# Allegro board TMC2160A_V10_220915.brd
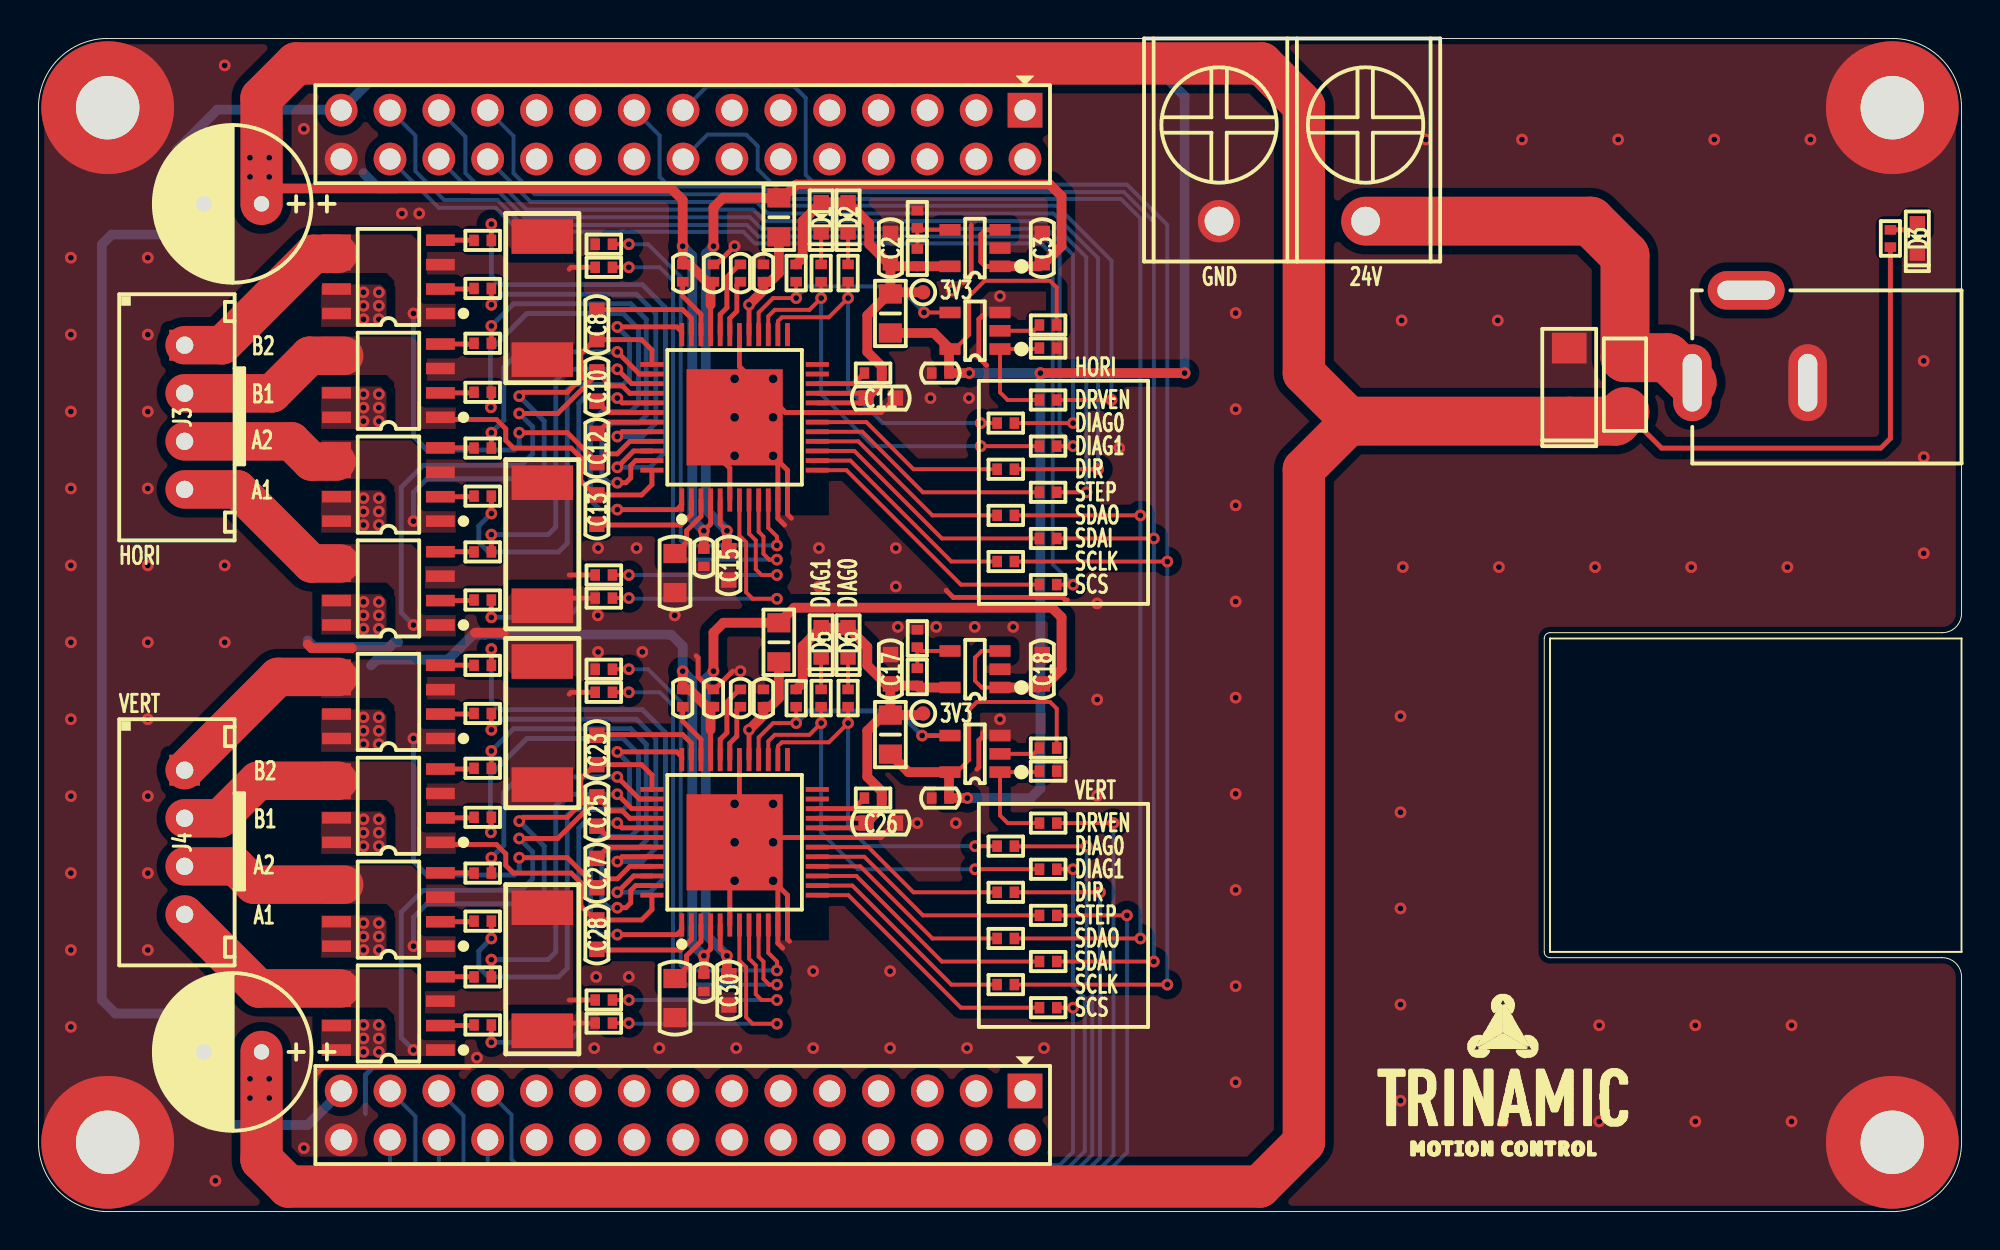
[diagram p0: board, top side]
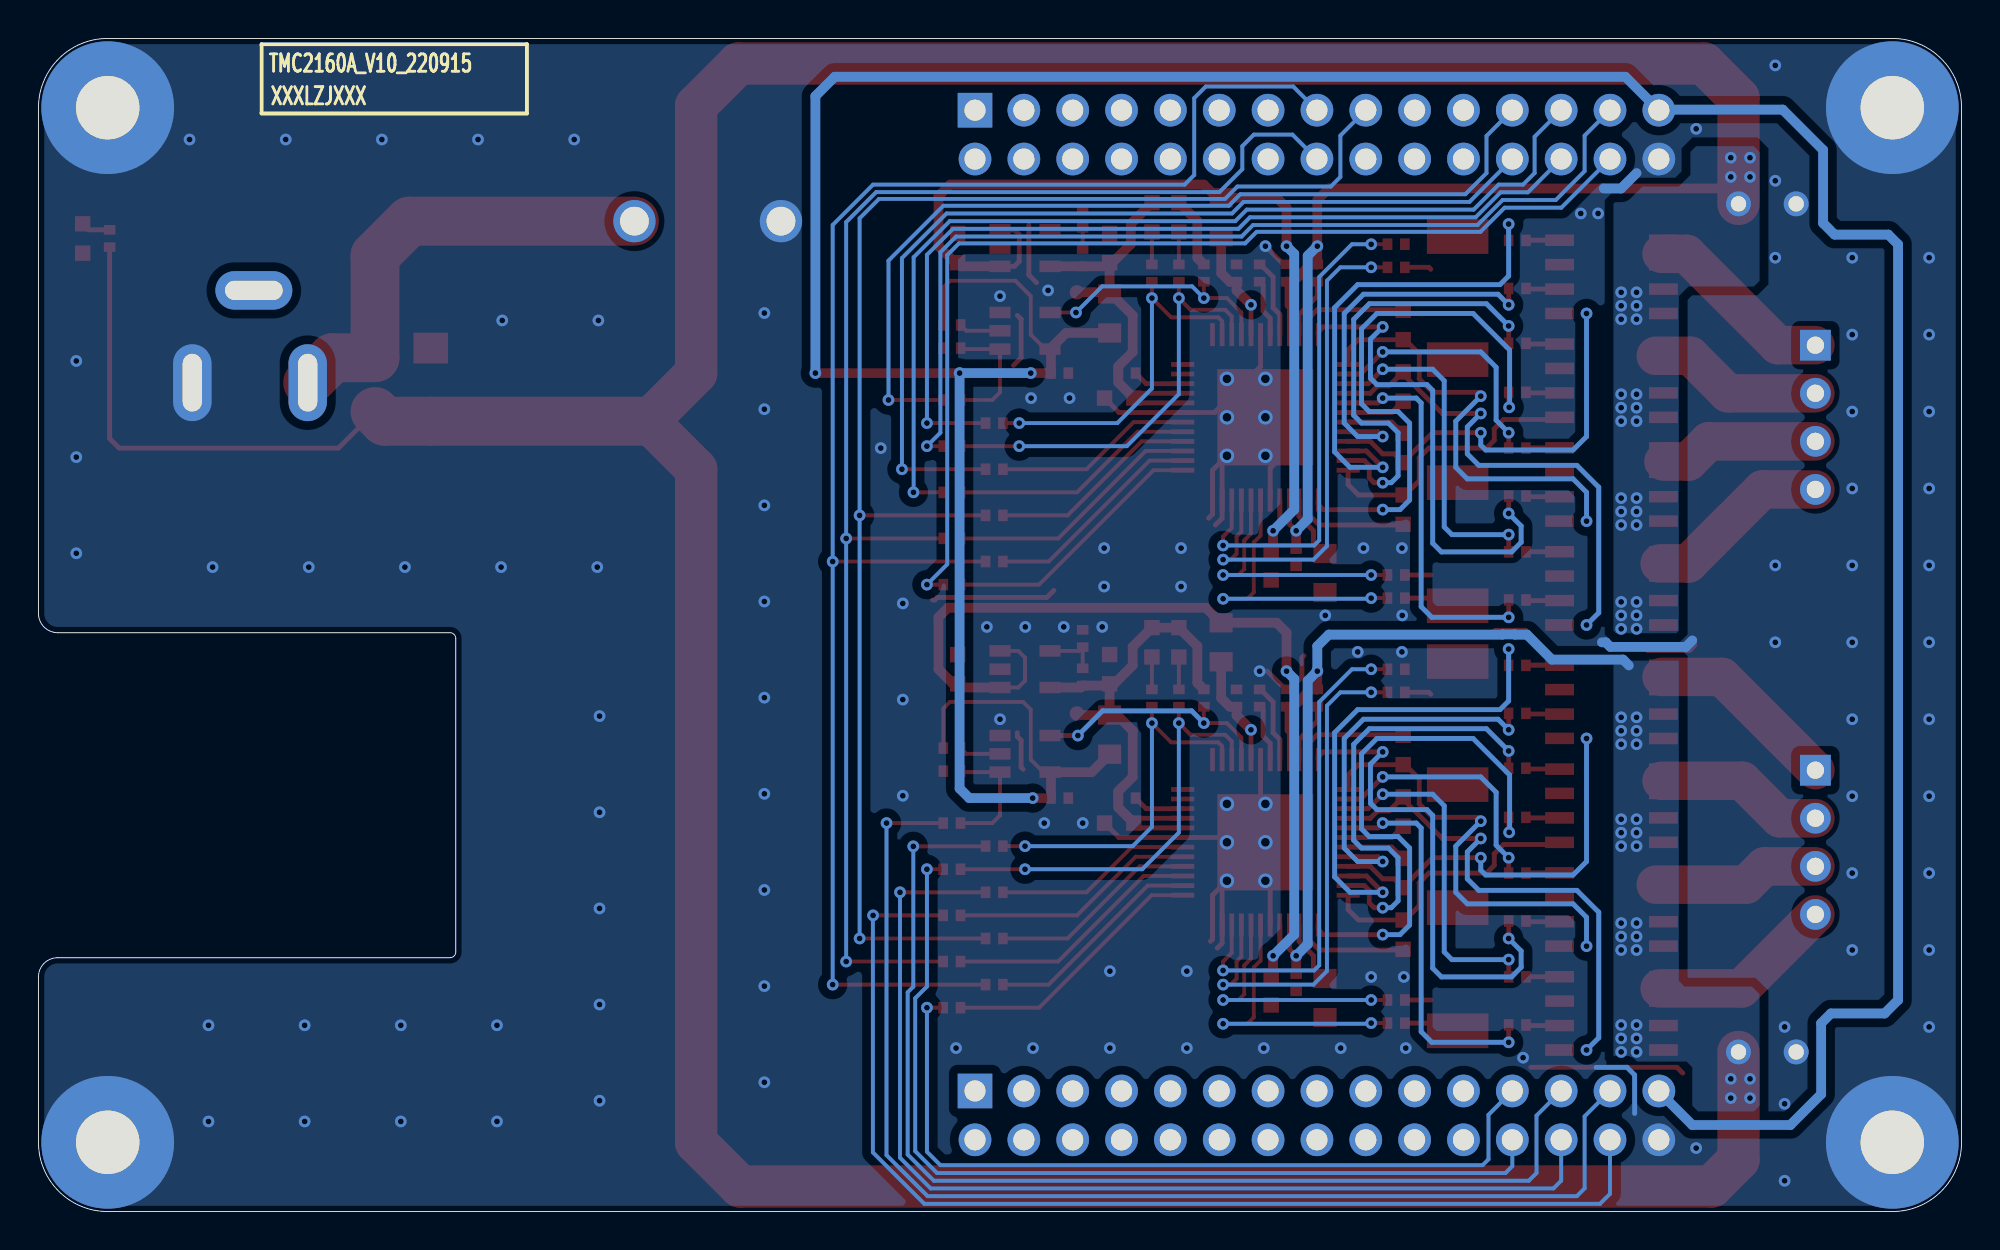
[diagram p1: board, bottom side, seen from below]

Outline 100 x 61 mm; copper layers: TOP, BOTTOM. Coordinates in mm from the lower left corner of the outline.
Outline path: 0,57.4 arc(1.05,59.95) 3.6,61 96.4,61 arc(98.95,59.95) 100,57.4 100,31.1 arc(99.71,30.39) 99,30.1 78.6,30.1 arc(78.39,30.01) 78.3,29.8 78.3,13.5 arc(78.39,13.29) 78.6,13.2 99,13.2 arc(99.71,12.91) 100,12.2 100,3.6 arc(98.95,1.05) 96.4,0 3.6,0 arc(1.05,1.05) 0,3.6 0,57.4

## Design rules (mm)
constraint set DEFAULT: min track width 0.203, pair gap 0.203

## Placement (name value [footprint] x y rotation side)
C1  100uF_50V  [CAP-3R0-8X12]  10.1 52.4 180 top
C2  10uF_10V  [C0603]  44.3 50.1 90 top
C3  10uF_10V  [C0603]  52.2 50.1 90 top
C4  100nF_50V  [C0402]  33.5 48.8 90 top
C5  100nF_50V  [C0402]  35.1 48.8 90 top
C6  22nF_50V  [C0402]  36.5 48.8 90 top
C7  100nF_50V  [C0402]  37.7 48.8 90 top
C8  470nF_50V  [C0603]  29.04 46.1 270 top
C9  100nF_50V  [C0402]  46.9 43.6 180 top
C10  470nF_50V  [C0603]  29.04 42.9 90 top
C11  10uF_10V  [C0603]  43.8 42.3 0 top
C12  470nF_50V  [C0603]  29.04 39.7 270 top
C13  470nF_50V  [C0603]  29.04 36.5 90 top
C14  100nF_50V  [C0402]  34.6 34 270 top
C15  10uF_10V  [C0603]  35.9 33.6 90 top
C16  10uF_25V  [C0805]  33.1 33.2 90 top
C17  10uF_10V  [C0603]  44.3 28.2 90 top
C18  10uF_10V  [C0603]  52.2 28.2 90 top
C19  100nF_50V  [C0402]  33.5 26.7 90 top
C20  100nF_50V  [C0402]  35.1 26.7 90 top
C21  22nF_50V  [C0402]  36.5 26.7 90 top
C22  100nF_50V  [C0402]  37.7 26.7 90 top
C23  470nF_50V  [C0603]  29.04 24 270 top
C24  100nF_50V  [C0402]  46.9 21.5 180 top
C25  470nF_50V  [C0603]  29.04 20.8 90 top
C26  10uF_10V  [C0603]  43.8 20.2 0 top
C27  470nF_50V  [C0603]  29.04 17.6 270 top
C28  470nF_50V  [C0603]  29.04 14.4 90 top
C29  100nF_50V  [C0402]  34.6 11.9 270 top
C30  10uF_10V  [C0603]  35.9 11.5 90 top
C31  10uF_25V  [C0805]  33.1 11.1 90 top
C32  100uF_50V  [CAP-3R0-8X12]  10.1 8.3 180 top
D1  GREEN-0603  [LED0603]  40.7 51.7 270 top
D2  GREEN-0603  [LED0603]  42.1 51.7 270 top
D3  GREEN-0603  [LED0603]  97.7 50.6 270 top
D4  SS56F  [SMAF]  79.6 43 270 top
D5  GREEN-0603  [LED0603]  40.7 29.6 270 top
D6  GREEN-0603  [LED0603]  42.1 29.6 270 top
DC1  -  [DC005]  92 43.1 180 top
F1  0469005.WR  [FUSE1206]  82.5 43 270 top
J1  -  [CN2X15-2P54-Z]  51.3 57.27 180 top
J2  KF7.62-2P  [KF7R62-2P]  65.2 51.5 0 top
J3  -  [HX25035-4A]  7.6 41.3 270 top
J4  -  [HX25035-4A]  7.6 19.2 270 top
J5  -  [CN2X15-2P54-Z]  51.3 6.27 180 top
L1  BLM21PG600SN1D  [L0805]  38.5 51.7 90 top
L2  BLM21PG600SN1D/NI  [L0805]  44.3 46.7 270 top
L3  BLM21PG600SN1D  [L0805]  38.5 29.6 90 top
L4  BLM21PG600SN1D/NI  [L0805]  44.3 24.8 270 top
MH1  HOLE_M3/NI  [HOLE6R90X3R40]  3.6 57.4 0 top
MH2  HOLE_M3/NI  [HOLE6R90X3R40]  96.4 57.4 0 top
MH3  HOLE_M3/NI  [HOLE6R90X3R40]  3.6 3.6 0 top
MH4  HOLE_M3/NI  [HOLE6R90X3R40]  96.4 3.6 0 top
NOREF  -  []  0 0 0 top
NOREF#2  -  []  0 0 90 top
NOREF#3  -  []  0 0 0 top
NOREF#4  -  []  0 0 90 top
NOREF#5  -  []  0 0 0 top
NOREF#6  -  []  0 0 90 top
Q1  NCE6005AS  [SOIC8]  18.2 48.6 90 top
Q2  NCE6005AS  [SOIC8]  18.2 43.2 90 top
Q3  NCE6005AS  [SOIC8]  18.2 37.8 90 top
Q4  NCE6005AS  [SOIC8]  18.2 32.4 90 top
Q5  NCE6005AS  [SOIC8]  18.2 26.5 90 top
Q6  NCE6005AS  [SOIC8]  18.2 21.1 90 top
Q7  NCE6005AS  [SOIC8]  18.2 15.7 90 top
Q8  NCE6005AS  [SOIC8]  18.2 10.3 90 top
R1  20K  [R0402]  45.7 51.6 90 top
R2  47K  [R0402]  96.3 50.6 90 top
R3  10R  [R0402]  23.1 50.5 180 top
R4  49R9  [R0402]  29.4 50.3 180 top
R5  33K  [R0402]  45.7 49.6 90 top
R6  49R9  [R0402]  29.4 49.1 180 top
R7  10K  [R0402]  39.4 48.8 90 top
R8  10K  [R0402]  40.7 48.8 270 top
R9  10K  [R0402]  42.1 48.8 270 top
R10  10R  [R0402]  23.1 48 180 top
R11  0R05  [R2512]  26.2 47.5 270 top
R12  10K  [R0402]  52.5 46.1 180 top
R13  10R  [R0402]  23.1 45.15 180 top
R14  10K  [R0402]  52.5 44.9 180 top
R15  10K  [R0402]  43.4 43.6 180 top
R16  10R  [R0402]  23.1 42.6 180 top
R17  0R  [R0402]  52.5 42.2 180 top
R18  0R  [R0402]  50.3 41 180 top
R19  0R  [R0402]  52.5 39.8 180 top
R20  10R  [R0402]  23.1 39.7 180 top
R21  0R  [R0402]  50.3 38.6 180 top
R22  0R  [R0402]  52.5 37.4 180 top
R23  10R  [R0402]  23.1 37.2 180 top
R24  0R  [R0402]  50.3 36.2 180 top
R25  0R  [R0402]  52.5 35 180 top
R26  0R05  [R2512]  26.2 34.7 90 top
R27  10R  [R0402]  23.1 34.3 180 top
R28  0R  [R0402]  50.3 33.8 180 top
R29  49R9  [R0402]  29.4 33.1 180 top
R30  0R  [R0402]  52.5 32.6 180 top
R31  49R9  [R0402]  29.4 31.9 180 top
R32  10R  [R0402]  23.1 31.8 180 top
R33  20K  [R0402]  45.7 29.8 90 top
R34  10R  [R0402]  23.1 28.4 180 top
R35  49R9  [R0402]  29.4 28.2 180 top
R36  33K  [R0402]  45.7 27.8 90 top
R37  49R9  [R0402]  29.4 27 180 top
R38  10K  [R0402]  39.4 26.7 90 top
R39  10K  [R0402]  40.7 26.7 270 top
R40  10K  [R0402]  42.1 26.7 270 top
R41  10R  [R0402]  23.1 25.9 180 top
R42  0R05  [R2512]  26.2 25.4 270 top
R43  10K  [R0402]  52.5 24.1 180 top
R44  10R  [R0402]  23.1 23.05 180 top
R45  10K  [R0402]  52.5 22.9 180 top
R46  10K  [R0402]  43.4 21.5 180 top
R47  10R  [R0402]  23.1 20.5 180 top
R48  0R  [R0402]  52.5 20.2 180 top
R49  0R  [R0402]  50.3 19 180 top
R50  0R  [R0402]  52.5 17.8 180 top
R51  10R  [R0402]  23.1 17.6 180 top
R52  0R  [R0402]  50.3 16.6 180 top
R53  0R  [R0402]  52.5 15.4 180 top
R54  10R  [R0402]  23.1 15.1 180 top
R55  0R  [R0402]  50.3 14.2 180 top
R56  0R  [R0402]  52.5 13 180 top
R57  0R05  [R2512]  26.2 12.6 90 top
R58  10R  [R0402]  23.1 12.2 180 top
R59  0R  [R0402]  50.3 11.8 180 top
R60  49R9  [R0402]  29.4 11 180 top
R61  0R  [R0402]  52.5 10.6 180 top
R62  49R9  [R0402]  29.4 9.8 180 top
R63  10R  [R0402]  23.1 9.7 180 top
TP1  TP/NI  [TP-0R75]  46 47.8 0 top
TP2  TP/NI  [TP-0R75]  46 25.9 0 top
U1  SPX3819M5-L-ADJ  [SOT23-5]  48.7 50.1 90 top
U2  SN74AHC1G00DBVR  [SOT23-5]  48.7 45.8 90 top
U3  TMC2160A-TA  [TQFP48-9X9X0R5-5R0X5R0]  36.2 41.3 0 top
U4  SPX3819M5-L-ADJ  [SOT23-5]  48.7 28.2 90 top
U5  SN74AHC1G00DBVR  [SOT23-5]  48.7 23.8 90 top
U6  TMC2160A-TA  [TQFP48-9X9X0R5-5R0X5R0]  36.2 19.2 0 top

## Library data of the parts
C1 C32 = CAPT_100UF_3528_6r3V_10%_LXXXX
C2-C10 C12-C25 C27-C31 = CAP NP_3
C11 C26 = CAP NP
D1 D2 D5 D6 = LED_3
D3 = LED_4
D4 = DIODE13_9
DC1 = DC005
F1 = FUSE
J1 J5 = CONN RCPT 15x2
J2 = CONN RCPT 2
J3 J4 = CONN RCPT 4
L1-L4 = IND_BEAD_0805_600OHM_1
MH1-MH4 = Hold_1
Q1-Q8 = IRF7351TRPBF
R1-R63 = R_Generic
TP1 TP2 = TestPoint
U1 U4 = SPX3819M5-L-1-2
U2 U5 = SN74AHC1G00DBVR
U3 U6 = TMC2160A-TA_0

## Footprints (pads in the part's own frame, mm; a bottom-side part is the same pattern mirrored in y, then rotated)
C0402
  rect 0.5x0.6 smd: 1(-0.45,0) 2(0.45,0)
C0603
  rect 0.8x0.8 smd: 1(-0.762,0) 2(0.762,0)
C0805
  rect 1x1.2 smd: 1(-1.016,0) 2(1.016,0)
CAP-3R0-8X12
  round 1.3 hole 0.8: 1(-1.5,0) 2(1.5,0)
CN2X15-2P54-Z
  rect 1.8x1.8 hole 1.1: 1(0,0)
  round 1.7 hole 1.1: 2(0,2.54) 3(2.54,0) 4(2.54,2.54) 5(5.08,0) 6(5.08,2.54) 7(7.62,0) 8(7.62,2.54) 9(10.16,0) 10(10.16,2.54) 11(12.7,0) 12(12.7,2.54) 13(15.24,0) 14(15.24,2.54) 15(17.78,0) 16(17.78,2.54) 17(20.32,0) 18(20.32,2.54) 19(22.86,0) 20(22.86,2.54) 21(25.4,0) 22(25.4,2.54) 23(27.94,0) 24(27.94,2.54) 25(30.48,0) 26(30.48,2.54) 27(33.02,0) 28(33.02,2.54) 29(35.56,0) 30(35.56,2.54)
DC005
  oval 2x4 hole 1x3: 1(6,0) 2(0,0)
  oval 4x2 hole 3x1: 3(3.2,-4.8)
FUSE1206
  rect 1.6x1.8 smd: 1(-1.4,0) 2(1.4,0)
HOLE6R90X3R40
  round 6.9 hole 3.3: 1(0,0)
HX25035-4A
  rect 1.6x1.6 hole 0.9: 1(-3.75,0)
  round 1.6 hole 0.9: 2(-1.25,0) 3(1.25,0) 4(3.75,0)
KF7R62-2P
  round 2.2 hole 1.5: 1(-3.81,0) 2(3.81,0)
L0805
  rect 1x1.2 smd: 1(-1.016,0) 2(1.016,0)
LED0603
  rect 0.8x0.8 smd: 1(-0.762,0) 2(0.762,0)
R0402
  rect 0.5x0.6 smd: 1(-0.45,0) 2(0.45,0)
R2512
  rect 1.8x3.2 smd: 1(-3.2,0) 2(3.2,0)
SMAF
  rect 1.6x1.8 smd: 1(-1.9,0) 2(1.9,0)
SOIC8
  rect 0.6x1.5 smd: 1(-1.9,-2.7) 2(-0.63,-2.7) 3(0.64,-2.7) 4(1.91,-2.7) 5(1.91,2.7) 6(0.64,2.7) 7(-0.63,2.7) 8(-1.9,2.7)
SOT23-5
  rect 0.6x1.1 smd: 1(-0.95,-1.3) 2(0,-1.3) 3(0.95,-1.3) 4(0.95,1.3) 5(-0.95,1.3)
TP-0R75
  round 0.75 smd: 1(0,0)
TQFP48-9X9X0R5-5R0X5R0
  rect 0.25x1.2 smd: 1(-2.75,-4.3) 2(-2.25,-4.3) 3(-1.75,-4.3) 4(-1.25,-4.3) 5(-0.75,-4.3) 6(-0.25,-4.3) 7(0.25,-4.3) 8(0.75,-4.3) 9(1.25,-4.3) 10(1.75,-4.3) 11(2.25,-4.3) 12(2.75,-4.3) 25(2.75,4.3) 26(2.25,4.3) 27(1.75,4.3) 28(1.25,4.3) 29(0.75,4.3) 30(0.25,4.3) 31(-0.25,4.3) 32(-0.75,4.3) 33(-1.25,4.3) 34(-1.75,4.3) 35(-2.25,4.3) 36(-2.75,4.3)
  rect 1.2x0.25 smd: 13(4.3,-2.75) 14(4.3,-2.25) 15(4.3,-1.75) 16(4.3,-1.25) 17(4.3,-0.75) 18(4.3,-0.25) 19(4.3,0.25) 20(4.3,0.75) 21(4.3,1.25) 22(4.3,1.75) 23(4.3,2.25) 24(4.3,2.75) 37(-4.3,2.75) 38(-4.3,2.25) 39(-4.3,1.75) 40(-4.3,1.25) 41(-4.3,0.75) 42(-4.3,0.25) 43(-4.3,-0.25) 44(-4.3,-0.75) 45(-4.3,-1.25) 46(-4.3,-1.75) 47(-4.3,-2.25) 48(-4.3,-2.75)
  rect 5x5 smd: 49(0,0)

## Nets
GND: C1.2 C2.2 C3.2 C5.2 C7.2 C9.2 C11.2 C14.2 C15.1 C16.1 C17.2 C18.2 C20.2 C22.2 C24.2 C26.2 C29.2 C30.1 C31.1 C32.2 D3.2(CATHODE) D4.1 DC1.2 J1.30 J2.1 J5.30 MH1.1 MH2.1 MH3.1 MH4.1 R1.2 R4.2 R11.1 R14.1 R26.1 R31.2 R33.2 R35.2 R42.1 R45.1 R57.1 R62.2 U1.2 U2.3 U3.6 U3.11 U3.12 U3.19 U3.30 U3.49 U4.2 U5.3 U6.6 U6.11 U6.12 U6.19 U6.30 U6.49
VCC_3.3V: C9.1 C24.1 J1.29 J5.29 L2.2(B) L4.2(B) R12.1 R43.1 U2.5 U5.5
VCC_3.3V_H: C2.1 C11.1 D1.1 D2.1 L2.1 R5.1 R7.2 R15.1 TP1.1 U1.5(VOUT) U3.20 U3.21
VCC_3.3V_V: C17.1 C26.1 D5.1 D6.1 L4.1 R36.1 R38.2 R46.1 TP2.1 U4.5(VOUT) U6.20 U6.21
VCC_5VOUT_H: C3.1 C15.2 L1.2(B) U1.1 U1.3 U3.5
VCC_5VOUT_V: C18.1 C30.2 L3.2(B) U4.1 U4.3 U6.5
VCC_12VOUT_H: C16.2 U3.3
VCC_12VOUT_V: C31.2 U6.3
VCC_24V: C1.1 C4.2 C5.1 C14.1 C19.2 C20.1 C29.1 C32.1 D4.2(ANODE_2) F1.2 Q1.7 Q1.8 Q2.7 Q2.8 Q3.7 Q3.8 Q4.7 Q4.8 Q5.7 Q5.8 Q6.7 Q6.8 Q7.7 Q7.8 Q8.7 Q8.8 R2.1 U3.4(VSA) U3.33 U6.4(VSA) U6.33
VCC_24V_IN: DC1.1 F1.1 J2.2
H_DRVEN: R7.1 U2.4(Y) U3.28
H_HA1: R32.1 U3.41
H_HA2: R23.1 U3.36
H_HB1: R16.1 U3.1
H_HB2: R10.1 U3.44
H_LA1: R27.1 U3.39
H_LA2: R20.1 U3.38
H_LB1: R13.1 U3.47
H_LB2: R3.1 U3.46
H_MOTOR_A1: C10.2 J3.4 Q4.1 Q4.5 Q4.6 U3.40
H_MOTOR_A2: C8.2 J3.3 Q3.1 Q3.5 Q3.6 U3.37
H_MOTOR_B1: C13.2 J3.2 Q2.1 Q2.5 Q2.6 U3.48
H_MOTOR_B2: C12.2 J3.1 Q1.1 Q1.5 Q1.6 U3.45
H_SRAH: R29.1 U3.8
H_SRAL: R31.1 U3.7
H_SRBH: R6.1 U3.9
H_SRBL: R4.1 U3.10
PA0: J1.1
PA3: J1.2
PA4: J1.3
PA5: J1.4
PA6: J1.5
PA8: J5.24 R50.1
PA8/V_DIAG1: R39.2 R50.2 U6.27
PA11: J5.23 R61.1
PA11/V_SCS: R61.2 U6.13
PA12: J5.22
PA15: J5.21
PB0: J1.6
PB1: J1.7
PB2: J1.8
PB8: J5.9
PB9: J5.8
PB10: J1.18
PB14: J1.19
PB15: J1.20
PC0: J5.1
PC6: J5.28 R53.1
PC6/V_STEP: R53.2 U6.17
PC7: J5.27 R48.1
PC7/V_DRVEN: R45.2 R48.2 U5.1
PC8: J5.26 R52.1
PC8/V_DIR: R52.2 U6.18
PC9: J5.25 R49.1
PC9/V_DIAG0: R40.2 R49.2 U6.26
PC10: J5.20
PC11: J5.19
PC12: J5.18
PC13: J5.2
PD0: J5.17(9)
PD1: J5.16
PD2: J5.15
PD3: J5.14
PD4: J5.13
PD5: J5.12
PD6: J5.11
PD7: J5.10
PD8: J1.21
PD9: J1.22
PD10: J1.23 R17.1
PD10/H_DRVEN: R14.2 R17.2 U2.1
PD11: J1.24 R21.1
PD11/H_DIR: R21.2 U3.18
PD12: J1.25 R22.1
PD12/H_STEP: R22.2 U3.17
PD13: J1.26 R18.1
PD13/H_DIAG0: R9.2 R18.2 U3.26
PD14: J1.27 R19.1
PD14/H_DIAG1: R8.2 R19.2 U3.27
PD15: J1.28 R30.1
PD15/H_SCS: R30.2 U3.13
PE0: J5.7
PE1: J5.6
PE2/SPI0_CS: J5.5
PE3: J5.4
PE4: J5.3
PE7: J1.9
PE8: J1.10
PE9: J1.11
PE10: J1.12
PE11: J1.13
PE12: J1.14
PE13: J1.15 R28.1 R59.1
PE13/H_SCLK: R28.2 U3.14
PE13/V_SCLK: R59.2 U6.14
PE14: J1.16 R25.1 R56.1
PE14/H_SDATI: R25.2 U3.15
PE14/V_SDATI: R56.2 U6.15
PE15: J1.17(9) R24.1 R55.1
PE15/H_SDATO: R24.2 U3.16
PE15/V_SDATO: R55.2 U6.16
V_DRVEN: R38.1 U5.4(Y) U6.28
V_HA1: R63.1 U6.41
V_HA2: R54.1 U6.36
V_HB1: R47.1 U6.1
V_HB2: R41.1 U6.44
V_LA1: R58.1 U6.39
V_LA2: R51.1 U6.38
V_LB1: R44.1 U6.47
V_LB2: R34.1 U6.46
V_MOTOR_A1: C25.2 J4.4 Q8.1 Q8.5 Q8.6 U6.40
V_MOTOR_A2: C23.2 J4.3 Q7.1 Q7.5 Q7.6 U6.37
V_MOTOR_B1: C28.2 J4.2 Q6.1 Q6.5 Q6.6 U6.48
V_MOTOR_B2: C27.2 J4.1 Q5.1 Q5.5 Q5.6 U6.45
V_SRAH: R60.1 U6.8
V_SRAL: R62.1 U6.7
V_SRBH: R37.1 U6.9
V_SRBL: R35.1 U6.10
N17303878: D3.1 R2.2
N17307565: C6.1 U3.31
N17307569: C6.2 U3.32
N17307573: C4.1 U3.34
N17307656: C12.1 U3.43
N17307666: C7.1 L1.1 U3.29
N17307699: C13.1 U3.2
N17307815: C8.1 U3.35
N17307862: C10.1 U3.42
N17307871: D1.2(CATHODE) R8.1
N17307873: D2.2(CATHODE) R9.1
N17307943: R15.2 U3.22
N17308782: Q2.2 R16.2
N17308789: Q1.2 R10.2
N17308801: Q1.3(S2) Q2.3(S2) R6.2 R11.2
N17308828: Q2.4 R13.2
N17308838: Q1.4 R3.2
N17308973: Q4.2 R32.2
N17308980: Q3.2 R23.2
N17308992: Q3.3(S2) Q4.3(S2) R26.2 R29.2
N17309019: Q4.4 R27.2
N17309029: Q3.4 R20.2
N17311488: C21.1 U6.31
N17311492: C21.2 U6.32
N17311496: C19.1 U6.34
N17311579: C27.1 U6.43
N17311589: C22.1 L3.1 U6.29
N17311622: C28.1 U6.2
N17311738: C23.1 U6.35
N17311785: C25.1 U6.42
N17311794: D5.2(CATHODE) R39.1
N17311796: D6.2(CATHODE) R40.1
N17311866: R46.2 U6.22
N17312677: Q6.2 R47.2
N17312684: Q5.2 R41.2
N17312696: Q5.3(S2) Q6.3(S2) R37.2 R42.2
N17312723: Q6.4 R44.2
N17312733: Q5.4 R34.2
N17312868: Q8.2 R63.2
N17312875: Q7.2 R54.2
N17312887: Q7.3(S2) Q8.3(S2) R57.2 R60.2
N17312914: Q8.4 R58.2
N17312924: Q7.4 R51.2
N17316894: R12.2 U2.2
N17317207: R43.2 U5.2
N17322095: R1.1 R5.2 U1.4
N17322682: R33.1 R36.2 U4.4

Pads without a net: DC1 3; U3 23 24 25; U6 23 24 25

## Via types
v1: diameter 0.61, hole 0.305, TOP to BOTTOM, 269 vias
v2: diameter 0.762, hole 0.457, TOP to BOTTOM, 12 vias

## Routing (per net, layer and track width the routed paths; a pad name or vN(x,y) marks a point on that pad's centre or on a via; arc(x,y) is an arc through that point)
GND: length 103.3
  TOP w0.254: v2(36.2,19.2) v2(38.2,17.2) 38.45,16.95 ; v2(36.2,19.2) 36.45,19.45 ; v2(36.2,19.2) 35.95,18.95 U6.6 ; 48.5,51.3 48.5,48.7 48.1,48.3 ; 38.45,16.95 U6.11 38.45,13.95 38.7,13.7 ; 38.45,16.95 38.95,16.45 U6.12 38.95,14.16 39.05,14.05 ; v2(36.2,41.3) 35.95,41.05 35.95,39.94 35.94,39.94 35.56,39.56 35.56,39.04 35.94,38.66 35.95,38.66 U3.6 ; v2(36.2,41.3) 36.45,41.55 ; v2(36.2,41.3) v2(38.2,39.3) 38.45,39.05 ; 34.2,28.9 34.3,28.8 34.3,27.8 34.95,27.15 C20.2 35.15,27.15 36.1,28.1 ; 38.45,39.05 U3.11 38.45,36.05 38.8,35.7 ; 38.45,39.05 38.95,38.55 U3.12 38.95,36.26 39.15,36.05 ; 49.1,24.9 49.1,24.7 48.9,24.5 48.9,23.1 48.8,23 ; U6.30 36.45,19.45 ; 36.45,19.45 U6.19 43.81,19.45 C26.2 ; 49.1,46.6 48.9,46.4 48.9,44.4 49.3,44 ; 36.45,41.55 36.45,42.66 36.46,42.66 36.84,43.04 36.84,43.56 36.46,43.94 36.45,43.94 U3.30 ; 36.45,41.55 37.56,41.55 37.56,41.56 37.94,41.94 38.46,41.94 38.84,41.56 38.84,41.55 U3.19 43.81,41.55 C11.2 ; 14.5,7.2 14.8,7.5 22.4,7.5 ; R57.1 26.6,9.8 R62.2 ; 47.2,32.3 47.57,31.93 53.27,31.93 53.4,31.8 53.5,31.8 ; C5.2 35.25,49.25 36,50 ; R26.1 26.6,31.9 R31.2
  TOP w0.508: 22.7,30.1 24.2,30.1 ; 16.3,29.3 14.2,29.3 14,29.5
  BOTTOM w0.254: 19,7.5 17.4,7.5 17,7.1 17,5.1
  BOTTOM w0.508: 14,29.7 14.34,29.36 18.26,29.36 18.5,29.6 18.7,29.6 ; 18.6,53.2 17.7,53.2 16.9,54
  vias: v1(1.69,49.6) v1(1.69,45.6) v1(1.69,41.6) v1(1.69,37.6) v1(1.69,33.6) v1(1.69,29.6) v1(1.69,25.6) v1(1.69,21.6) v1(1.69,17.6) v1(1.69,13.6) v1(1.69,9.6) v1(5.69,49.6) v1(5.69,45.6) v1(5.69,41.6) v1(5.69,37.6) v1(5.69,33.6) v1(5.69,29.6) v1(5.69,25.6) v1(5.69,21.6) v1(5.69,17.6) v1(5.69,13.6) v1(9.2,9.6) v1(9.2,5.6) v1(9.2,1.6) v1(9.69,59.6) v1(9.69,53.6) v1(9.69,49.6) v1(9.69,33.6) v1(9.69,29.6) v1(13.8,56.3) v1(13.8,3.3) v1(18.9,51.9) v1(19.8,51.9) v1(22.8,8) v1(28.9,8.5) v1(29,12.2) v1(29.1,34.5) v1(29.09,31) v1(29.1,29.1) v1(30.7,12.2) v1(31.1,34.5) v1(31.4,29.1) v1(32.29,8.5) v1(33.09,31) v1(36.2,50.2) v1(36.29,8.5) v1(36.5,28.1) v1(40.29,12.5) v1(40.29,8.5) v1(40.59,34.5) v1(40.59,32.5) v1(44.29,12.5) v1(44.29,8.5) v1(44.59,34.5) v1(44.59,32.5) v1(44.69,30.4) v1(45.7,20.2) v1(46.39,42.3) v1(46.69,30.4) v1(47.5,47.9) v1(47.7,20.2) v1(48.29,8.5) v1(48.39,42.3) v1(48.69,30.4) v1(50,47.6) v1(50,25.6) v1(50.69,30.4) v1(52.29,8.5) v1(55.05,31.62) v1(55.05,26.62) v1(55.05,21.62) v1(56.2,39.7) v1(62.25,46.72) v1(62.25,41.72) v1(62.25,36.72) v1(62.25,31.72) v1(62.25,26.72) v1(62.25,21.72) v1(62.25,16.72) v1(62.25,11.72) v1(62.25,6.72) v1(70.82,25.76) v1(70.82,20.76) v1(70.82,15.76) v1(70.82,10.76) v1(70.82,5.76) v1(70.88,46.34) v1(70.94,33.51) v1(72.14,55.75) v1(75.88,46.34) v1(75.94,33.51) v1(76.16,9.68) v1(76.16,4.68) v1(77.14,55.75) v1(80.94,33.51) v1(81.16,9.68) v1(81.16,4.68) v1(82.14,55.75) v1(85.94,33.51) v1(86.16,9.68) v1(86.16,4.68) v1(87.14,55.75) v1(90.94,33.51) v1(91.16,9.68) v1(91.16,4.68) v1(92.14,55.75) v1(98.03,44.23) v1(98.03,39.23) v1(98.03,34.23) v2(36.2,43.3) v2(36.2,39.3) v2(36.2,21.2) v2(36.2,17.2) v2(38.2,43.3) v2(38.2,41.3) v2(38.2,21.2) v2(38.2,19.2)
VCC_3.3V: length 203.8
  TOP w0.203: R43.1 52.95,26.15 52.6,26.5 48.8,26.5 48.4,26.1 48.4,23.5 47.75,22.85 U5.5 ; U2.5 47.65,44.85 48.4,45.6 48.4,47.6 49.2,48.4 52.6,48.4 52.95,48.05 R12.1
  TOP w0.508: v1(48.4,43.6) C9.1 47.35,44.8 U2.5 46.57,45.68 L2.2 ; v1(48.3,21.5) C24.1 47.35,22.8 U5.5 45.23,22.85 L4.2 ; v1(52.1,43.6) v1(59.6,43.6)
  BOTTOM w0.508: J5.29 15.74,6.24 14,4.5 8.9,4.5 7.3,6.1 7.3,9.79 6.79,10.3 4,10.3 3.3,11 3.3,50.29 3.81,50.8 6.6,50.8 7.2,51.4 7.2,55.2 9.3,57.3 15.71,57.3 J1.29 17.48,59.01 58.59,59.01 59.6,58 v1(59.6,43.6) ; v1(48.3,21.5) 51.6,21.5 52.1,22 v1(52.1,43.6) v1(48.4,43.6)
VCC_3.3V_H: length 27.7
  TOP w0.254: U3.21 42.75,42.55 43,42.3 ; 43,42.3 42.75,42.05 U3.20 ; 43,42.3 C11.1
  TOP w0.508: C2.1 44.16,49.34 43.2,50.3 43.2,51.36 D2.1 D1.1 39.74,51.5 39.74,49.59 R7.2 ; C2.1 L2.1 ; C2.1 44.49,49.15 R5.1 U1.5 ; L2.1 44.38,47.8 TP1.1 ; L2.1 44.22,47.72 43.1,46.6 43.1,44.7 43.85,43.95 R15.1 43.85,43.11 C11.1
VCC_3.3V_V: length 27.9
  TOP w0.254: 43,20.2 42.75,20.45 U6.21 ; 43,20.2 42.75,19.95 U6.20 ; 43,20.2 C26.1
  TOP w0.508: C17.1 44.06,27.44 43.1,28.4 43.1,29.36 D6.1 D5.1 39.74,29.4 39.74,27.49 R38.2 ; C17.1 L4.1 ; C17.1 44.39,27.35 R36.1 45.8,27.25 U4.5 ; TP2.1 45.92,25.82 L4.1 ; L4.1 43.92,25.82 43.1,25 43.1,22.6 43.85,21.85 R46.1 43.85,21.01 C26.1
VCC_5VOUT_H: length 48.9
  TOP w0.254: U1.1 49.25,49.15 49,49.4 49,50.8 49.25,51.05 U1.3 ; U3.5 35.45,35.75 v1(35.8,35.4)
  TOP w0.508: C15.2 35.8,34.46 v1(35.8,35.4) ; v1(35.1,50.2) 35.1,52.21 35.61,52.72 L1.2 38.72,52.72 39.4,53.4 52.6,53.4 53.2,52.8 53.2,50.2 52.34,49.34 C3.1 52.01,49.15 U1.1
  BOTTOM w0.508: v1(35.8,35.4) 34.7,36.5 34.7,49.8 v1(35.1,50.2)
VCC_5VOUT_V: length 49.5
  TOP w0.203: U4.1 49.05,27.25 48.7,27.6 48.7,28.8 49.05,29.15 U4.3
  TOP w0.254: v1(35.8,13.3) 35.45,13.65 U6.5
  TOP w0.508: v1(35.1,28.1) 35.1,30.1 35.62,30.62 L3.2 38.52,30.62 39.3,31.4 52.7,31.4 53.2,30.9 53.2,28.2 52.44,27.44 C18.1 52.01,27.25 U4.1 ; C30.2 35.8,12.36 v1(35.8,13.3)
  BOTTOM w0.508: v1(35.8,13.3) 34.7,14.4 34.7,27.7 v1(35.1,28.1)
VCC_12VOUT_H: length 3.3
  TOP w0.254: U3.3 34.45,36.15 33.7,35.4 33.7,34.82 C16.2
VCC_12VOUT_V: length 3.3
  TOP w0.254: C31.2 33.7,12.72 33.7,13.3 34.45,14.05 U6.3
VCC_24V: length 308
  TOP w0.254: 34.95,47.15 U3.33 ; U6.4 34.95,13.65 v1(34.6,13.3) ; R2.1 96.3,40.2 95.8,39.7 84.4,39.7 F1.2 ; U3.4 34.95,35.75 v1(34.6,35.4) ; 34.95,25.05 U6.33
  TOP w0.508: 34.95,25.05 34.95,26.1 C20.1 34.75,26.25 33.85,27.15 C19.2 v1(33.5,28.1) ; C29.1 v1(34.6,13.3) ; v1(12,53.8) 12.6,53.2 32.9,53.2 33.5,52.6 v1(33.5,50.2) C4.2 33.85,49.25 34.75,48.35 C5.1 34.95,48.2 34.95,47.15 ; C14.1 v1(34.6,35.4)
  TOP w2.2: C1.1 11.6,57.9 13.4,59.7 63.6,59.7 65.8,57.5 65.8,43.6 68.3,41.1 65.8,38.6 65.8,3.6 63.5,1.3 13,1.3 11.6,2.7 C32.1
  TOP w2.54: F1.2 82,41.1 D4.2 68.3,41.1
  BOTTOM w0.508: v1(33.5,50.2) 34,49.7 34,36 v1(34.6,35.4) ; 17.3,28.4 17.6,28.7 21.3,28.7 22.6,30 23.22,30 23.23,30.01 23.87,30.01 23.88,30 32.9,30 33.5,29.4 v1(33.5,28.1) 34,27.6 34,13.9 v1(34.6,13.3)
  vias: v1(11,54.8) v1(11,53.8) v1(11,6.9) v1(11,5.9) v1(12,54.8) v1(12,6.9) v1(12,5.9) v1(16.9,47.8) v1(16.9,47.1) v1(16.9,46.4) v1(16.9,42.5) v1(16.9,41.8) v1(16.9,41.1) v1(16.9,37.1) v1(16.9,36.4) v1(16.9,35.7) v1(16.9,31.7) v1(16.9,31) v1(16.9,30.3) v1(16.9,25.7) v1(16.9,25) v1(16.9,24.3) v1(16.9,20.4) v1(16.9,19.7) v1(16.9,19) v1(16.9,15) v1(16.9,14.3) v1(16.9,13.6) v1(16.9,9.7) v1(16.9,9) v1(16.9,8.3) v1(17.7,47.8) v1(17.7,47.1) v1(17.7,46.4) v1(17.7,42.5) v1(17.7,41.8) v1(17.7,41.1) v1(17.7,37.1) v1(17.7,36.4) v1(17.7,35.7) v1(17.7,31.7) v1(17.7,31) v1(17.7,30.3) v1(17.7,25.7) v1(17.7,25) v1(17.7,24.3) v1(17.7,20.4) v1(17.7,19.7) v1(17.7,19) v1(17.7,15) v1(17.7,14.3) v1(17.7,13.6) v1(17.7,9.7) v1(17.7,9) v1(17.7,8.3)
VCC_24V_IN: length 23.6
  TOP w2.54: DC1.1 84.7,44.4 F1.1 82.5,49.7 80.7,51.5 J2.2
H_DRVEN: length 13.1
  TOP w0.203: U2.4 v1(46.05,46.75) ; R7.1 v1(39.4,47.5) 38.2,47.5 37.45,46.75 U3.28
  BOTTOM w0.203: v1(46.05,46.75) 44.69,48.11 40.01,48.11 v1(39.4,47.5)
H_HA1: length 20.3
  TOP w0.254: R32.1 v1(23.55,30.9) ; U3.41 30.35,42.05 v1(30.1,42.3)
  BOTTOM w0.254: v1(23.55,30.9) 27.55,30.9 28.1,31.45 28.1,42.05 28.35,42.3 v1(30.1,42.3)
H_HA2: length 25.6
  TOP w0.254: R23.1 v1(23.55,36.3) ; U3.36 33.45,45.75 33.2,46 v1(30.1,46)
  BOTTOM w0.254: v1(23.55,36.3) 22.9,35.65 22.9,34.8 23.4,34.3 27.05,34.3 27.5,34.75 27.5,42.7 27.8,43 30.4,43 30.73,43.34 30.73,45.37 v1(30.1,46)
H_HB1: length 28.7
  TOP w0.254: R16.1 23.55,41.85 v1(23.52,41.82) ; v1(30.1,36.5) 33.2,36.5 33.45,36.75 U3.1
  BOTTOM w0.254: v1(30.1,36.5) 29.2,36.5 28.7,37 28.7,41 29.3,41.6 30.8,41.6 31.2,42 31.2,45.9 30.4,46.7 25.4,46.7 23.5,44.8 23.5,41.84 v1(23.52,41.82)
H_HB2: length 19.9
  TOP w0.254: U3.44 30.35,40.55 v1(30.1,40.3) ; R10.1 v1(23.55,47.15)
  BOTTOM w0.254: v1(23.55,47.15) 24.1,47.7 31.1,47.7 32.1,46.7 32.1,41 31.4,40.3 v1(30.1,40.3)
H_LA1: length 17.6
  TOP w0.254: v1(30.1,43.8) 30.85,43.05 U3.39 ; R27.1 v1(23.55,35.2)
  BOTTOM w0.254: v1(30.1,43.8) 27.5,43.8 26.9,43.2 26.9,35.6 26.5,35.2 v1(23.55,35.2)
H_LA2: length 13
  TOP w0.254: U3.38 31.25,43.55 v1(30.1,44.7) ; R20.1 v1(23.55,40.5)
  BOTTOM w0.254: v1(30.1,44.7) 25,44.7 24.2,43.9 24.2,41.15 v1(23.55,40.5)
H_LB1: length 23.3
  TOP w0.254: R13.1 v1(23.55,46.05) ; U3.47 31.05,39.05 30.8,38.8 30.8,38.15 30.55,37.9 v1(30.1,37.9)
  BOTTOM w0.254: v1(23.55,46.05) 24.71,47.21 30.79,47.21 31.61,46.39 31.61,41.41 31.2,41 29.8,41 29.3,40.5 29.3,38.25 29.65,37.9 v1(30.1,37.9)
H_LB2: length 25.8
  TOP w0.254: U3.46 30.95,39.55 v1(30.1,38.7) ; R3.1 v1(23.55,51.35)
  BOTTOM w0.254: v1(23.55,51.35) 23.55,48.65 24,48.2 31.4,48.2 32.6,47 32.6,39.5 31.8,38.7 v1(30.1,38.7)
H_MOTOR_A1: length 35.4
  TOP w0.254: v1(25,41.5) 27,41.5 29.04,43.54 C10.2 29.76,42.94 30.36,42.94 30.75,42.55 U3.40
  TOP w2: J3.4 10.35,37.55 14.2,33.7 15.7,33.7
  BOTTOM w0.254: v1(25,41.5) 25.7,40.8 25.7,39.4 25.1,38.8 20,38.8 18.86,37.66 18.86,31.14 v1(19.5,30.5)
H_MOTOR_A2: length 31.3
  TOP w0.254: U3.37 31.9,44.8 31.36,45.34 C8.2 28.94,45.34 28.2,44.6 28.2,43.3 27.5,42.6 25.2,42.6 v1(25,42.4)
  TOP w2: J3.3 13.15,40.05 14.2,39 15.5,39
  BOTTOM w0.254: v1(19.5,35.9) 19.5,37.4 20.2,38.1 25.7,38.1 26.3,38.7 26.3,41.1 v1(25,42.4)
H_MOTOR_B1: length 23.8
  TOP w0.254: U3.48 31.9,37.8 31.36,37.26 C13.2 28.94,37.26 28.2,38 28.2,39.2 27.7,39.7 24.7,39.7 24.3,40.1 24.3,40.7 23.82,41.19 21.11,41.19 21.07,41.13 Q2.1
  TOP w2: 15.9,44.5 14.1,44.5 12.15,42.55 J3.2
H_MOTOR_B2: length 30.9
  TOP w0.254: v1(25,40.5) 27.5,40.5 29.04,38.96 C12.2 29.5,39.4 30.1,39.4 30.75,40.05 U3.45
  TOP w2: 15.6,49.8 14.3,49.8 9.55,45.05 J3.1
  BOTTOM w0.254: v1(19.5,46.7) 19.5,40.3 20.2,39.6 24.75,39.6 25,39.85 v1(25,40.5)
H_SRAH: length 13.5
  TOP w0.203: U3.8 36.95,35.25 37.3,34.9 37.3,33.4 37.6,33.1 v1(38.4,33.1) ; R29.1 v1(30.7,33.1)
  BOTTOM w0.203: v1(38.4,33.1) v1(30.7,33.1)
H_SRAL: length 15.2
  TOP w0.203: R31.1 v1(30.7,31.9) ; U3.7 36.45,35.15 36.8,34.8 36.8,32.2 37.14,31.86 v1(38.4,31.86)
  BOTTOM w0.203: v1(38.4,31.86) 30.74,31.86 v1(30.7,31.9)
H_SRBH: length 26.7
  TOP w0.203: U3.9 37.45,35.35 37.7,35.1 37.7,34.2 38,33.9 v1(38.4,33.9) ; R6.1 v1(30.7,49.1)
  BOTTOM w0.203: v1(30.7,49.1) 32.3,49.1 33,48.4 33,34.6 33.7,33.9 v1(38.4,33.9)
H_SRBL: length 25.6
  TOP w0.203: v1(38.4,34.64) 38.4,35.1 37.95,35.55 U3.10 ; R4.1 v1(30.7,50.3)
  BOTTOM w0.203: v1(38.4,34.64) 33.66,34.64 33.4,34.9 33.4,48.6 31.7,50.3 v1(30.7,50.3)
PA8: length 48.8
  TOP w0.203: v1(53.8,17.8) R50.1
  BOTTOM w0.203: v1(53.8,17.8) 53.8,11.7 54.41,11.09 54.41,3.14 53.27,2 23.72,2 23.36,2.36 J5.24
PA8/V_DIAG1: length 22.8
  TOP w0.203: U6.27 37.95,24.45 38.29,24.79 40.09,24.79 v1(40.7,25.4) R39.2 ; R50.2 v1(48.7,17.8)
  BOTTOM w0.203: v1(48.7,17.8) 42.6,17.8 40.7,19.7 v1(40.7,25.4)
PA11: length 42
  TOP w0.203: R61.1 v1(53.8,10.6)
  BOTTOM w0.203: v1(53.8,10.6) 53.8,3.11 53.1,2.41 24.9,2.41 24.6,2.71 24.6,5.03 J5.23
PA11/V_SCS: length 14
  TOP w0.203: R61.2 47.96,10.6 42.11,16.45 U6.13
PC6: length 58.4
  TOP w0.203: R53.1 v1(56.6,15.4)
  BOTTOM w0.203: v1(56.6,15.4) 56.61,15.39 56.61,3.08 53.93,0.4 18.8,0.4 18.28,0.92 J5.28
PC6/V_STEP: length 12.8
  TOP w0.203: U6.17 42.94,18.45 45.99,15.4 R53.2
PC7: length 63.2
  TOP w0.203: v1(55.9,20.2) R48.1
  BOTTOM w0.203: v1(55.9,20.2) 55.9,2.93 53.77,0.8 20,0.8 19.6,1.2 19.6,4.95 J5.27
PC7/V_DRVEN: length 6.5
  TOP w0.203: R48.2 50.4,20.2 50,20.6 U5.1 52,22.85 R45.2
PC8: length 55.6
  TOP w0.203: v1(55.2,16.6) R52.1
  BOTTOM w0.203: v1(55.2,16.6) 55.2,2.8 53.6,1.2 21.22,1.2 20.82,1.6 J5.26
PC8/V_DIR: length 10.3
  TOP w0.203: U6.18 43.15,18.95 45.5,16.6 R52.2
PC9: length 58.1
  TOP w0.203: R49.1 50.76,18.99 v1(54.51,18.99)
  BOTTOM w0.203: J5.25 22.1,4.99 22.1,2 22.5,1.6 53.44,1.6 54.8,2.96 54.8,11.4 54.51,11.69 v1(54.51,18.99)
PC9/V_DIAG0: length 19.3
  TOP w0.203: U6.26 38.45,24.2 38.65,24.4 41.1,24.4 v1(42.1,25.4) R40.2 ; R49.2 v1(48.7,19)
  BOTTOM w0.203: v1(42.1,25.4) 42.1,20 43.1,19 v1(48.7,19)
PD10: length 46.9
  TOP w0.203: R17.1 v1(55.8,42.2)
  BOTTOM w0.203: v1(55.8,42.2) 55.8,49.44 52.94,52.3 38.1,52.3 37.5,52.9 25.8,52.9 24.7,54 24.7,55.93 J1.23
PD10/H_DRVEN: length 6.5
  TOP w0.203: R14.2 52,44.85 U2.1 50,42.6 50.4,42.2 R17.2
PD11: length 49.2
  TOP w0.203: R21.1 v1(55.1,38.6)
  BOTTOM w0.203: v1(55.1,38.6) 55.1,49.58 52.78,51.9 37.93,51.9 37.33,52.5 25.59,52.5 J1.24
PD11/H_DIR: length 10.4
  TOP w0.203: U3.18 43.05,41.05 45.5,38.6 R21.2
PD12: length 51.7
  TOP w0.203: R22.1 v1(54.5,37.4)
  BOTTOM w0.203: J1.25 22.2,55.89 22.2,54 22.8,53.4 24.07,53.4 25.37,52.1 37.17,52.1 37.77,51.5 52.61,51.5 54.49,49.62 54.49,37.41 v1(54.5,37.4)
PD12/H_STEP: length 12.9
  TOP w0.203: R22.2 45.99,37.4 42.84,40.55 U3.17
PD13: length 46.8
  TOP w0.203: R18.1 v1(53.8,41)
  BOTTOM w0.203: v1(53.8,41) 53.8,49.75 52.45,51.1 37.6,51.1 37,51.7 25.27,51.7 23.97,53 22.55,53 J1.26
PD13/H_DIAG0: length 18.9
  TOP w0.203: R9.2 v1(42.1,47.5) 41.1,46.5 38.65,46.5 38.45,46.3 U3.26 ; R18.2 v1(49,41)
  BOTTOM w0.203: v1(49,41) 43.9,41 42.1,42.8 v1(42.1,47.5)
PD14: length 50.2
  TOP w0.203: R19.1 v1(53.8,39.8)
  BOTTOM w0.203: J1.27 19.6,55.95 19.6,54.1 21.1,52.6 23.87,52.6 25.17,51.3 36.84,51.3 37.44,50.7 52.28,50.7 53.1,49.88 53.1,40.5 v1(53.8,39.8)
PD14/H_DIAG1: length 22.4
  TOP w0.203: U3.27 37.95,46.55 38.29,46.89 40.09,46.89 v1(40.7,47.5) R8.2 ; R19.2 v1(49,39.8)
  BOTTOM w0.203: v1(40.7,47.5) 40.7,42.5 43.4,39.8 v1(49,39.8)
PD15: length 55
  TOP w0.203: R30.1 v1(53.8,32.6)
  BOTTOM w0.203: v1(53.8,32.6) 52.74,33.66 52.74,49.73 52.13,50.34 37.26,50.34 36.66,50.94 25.02,50.94 23.76,52.2 20.81,52.2 J1.28
PD15/H_SCS: length 14
  TOP w0.203: R30.2 47.96,32.6 42.01,38.55 U3.13
PE13: length 86.4
  TOP w0.203: R59.1 v1(58.7,11.8) ; R28.1 v1(58.7,33.8)
  BOTTOM w0.203: v1(58.7,11.8) v1(58.7,33.8) 58.7,51.3 56.6,53.4 40.4,53.4 39.9,53.9 39.9,57.9 39.3,58.5 34.75,58.5 J1.15
PE13/H_SCLK: length 11.5
  TOP w0.203: R28.2 47.47,33.8 42.22,39.05 U3.14
PE13/V_SCLK: length 11.5
  TOP w0.203: U6.14 42.32,16.95 47.47,11.8 R59.2
PE14: length 76.1
  TOP w0.203: v1(58,13) R56.1 ; R25.1 v1(58,35)
  BOTTOM w0.203: J1.16 34.79,56 36.8,56 37.4,55.4 37.4,54.2 38.59,53.01 56.44,53.01 58,51.45 v1(58,35) v1(58,13)
PE14/H_SDATI: length 13.4
  TOP w0.203: U3.15 42.43,39.55 46.98,35 R25.2
PE14/V_SDATI: length 13.4
  TOP w0.203: R56.2 46.98,13 42.53,17.45 U6.15
PE15: length 80.5
  TOP w0.203: v1(57.3,14.2) R55.1 ; R24.1 v1(57.3,36.2)
  BOTTOM w0.203: v1(57.3,14.2) v1(57.3,36.2) 57.3,51.65 56.29,52.66 38.3,52.66 37.66,53.3 32.8,53.3 32.3,53.8 32.3,55.95 J1.17
PE15/H_SDATO: length 10.9
  TOP w0.203: R24.2 46.49,36.2 42.64,40.05 U3.16
PE15/V_SDATO: length 10.9
  TOP w0.203: U6.16 42.74,17.95 46.49,14.2 R55.2
V_DRVEN: length 13.1
  TOP w0.203: R38.1 v1(39.4,25.4) 38.2,25.4 37.45,24.65 U6.28
  TOP w0.254: U5.4 v1(45.95,24.75)
  BOTTOM w0.254: v1(39.4,25.4) 40.03,26.04 44.66,26.04 v1(45.95,24.75)
V_HA1: length 20.3
  TOP w0.254: R63.1 v1(23.55,8.8) ; U6.41 30.35,19.95 v1(30.1,20.2)
  BOTTOM w0.254: v1(30.1,20.2) 28.35,20.2 28.1,19.95 28.1,9.35 27.55,8.8 v1(23.55,8.8)
V_HA2: length 25.6
  TOP w0.254: U6.36 33.45,23.65 33.2,23.9 v1(30.1,23.9) ; R54.1 v1(23.55,14.2)
  BOTTOM w0.254: v1(30.1,23.9) 30.73,23.27 30.73,21.23 30.4,20.9 27.8,20.9 27.5,20.6 27.5,12.65 27.05,12.2 23.4,12.2 22.9,12.7 22.9,13.55 v1(23.55,14.2)
V_HB1: length 28.7
  TOP w0.254: R47.1 23.55,19.75 v1(23.52,19.72) ; v1(30.1,14.4) 33.2,14.4 33.45,14.65 U6.1
  BOTTOM w0.254: v1(23.52,19.72) 23.5,19.74 23.5,22.7 25.4,24.6 30.4,24.6 31.2,23.8 31.2,19.9 30.8,19.5 29.3,19.5 28.7,18.9 28.7,14.9 29.2,14.4 v1(30.1,14.4)
V_HB2: length 19.9
  TOP w0.254: v1(30.1,18.2) 30.35,18.45 U6.44 ; R41.1 v1(23.55,25.05)
  BOTTOM w0.254: v1(30.1,18.2) 31.4,18.2 32.1,18.9 32.1,24.6 31.1,25.6 24.1,25.6 v1(23.55,25.05)
V_LA1: length 17.6
  TOP w0.254: R58.1 v1(23.55,13.1) ; U6.39 30.85,20.95 v1(30.1,21.7)
  BOTTOM w0.254: v1(30.1,21.7) 27.5,21.7 26.9,21.1 26.9,13.5 26.5,13.1 v1(23.55,13.1)
V_LA2: length 13
  TOP w0.254: R51.1 v1(23.55,18.4) ; v1(30.1,22.6) 31.25,21.45 U6.38
  BOTTOM w0.254: v1(23.55,18.4) 24.2,19.05 24.2,21.8 25,22.6 v1(30.1,22.6)
V_LB1: length 23.3
  TOP w0.254: v1(30.1,15.8) 30.55,15.8 30.8,16.05 30.8,16.7 31.05,16.95 U6.47 ; R44.1 v1(23.55,23.95)
  BOTTOM w0.254: v1(23.55,23.95) 24.71,25.11 30.79,25.11 31.61,24.29 31.61,19.31 31.2,18.9 29.8,18.9 29.3,18.4 29.3,16.15 29.65,15.8 v1(30.1,15.8)
V_LB2: length 25.8
  TOP w0.254: U6.46 30.95,17.45 v1(30.1,16.6) ; R34.1 v1(23.55,29.25)
  BOTTOM w0.254: v1(23.55,29.25) 23.55,26.55 24,26.1 31.4,26.1 32.6,24.9 32.6,17.4 31.8,16.6 v1(30.1,16.6)
V_MOTOR_A1: length 35.4
  TOP w0.254: v1(25,19.4) 27,19.4 29.04,21.44 C25.2 29.76,20.84 30.36,20.84 30.75,20.45 U6.40
  TOP w2: J4.4 11.45,11.6 15.7,11.6
  BOTTOM w0.254: v1(19.5,8.4) 18.86,9.04 18.86,15.56 20,16.7 25.1,16.7 25.7,17.3 25.7,18.7 v1(25,19.4)
V_MOTOR_A2: length 31.6
  TOP w0.254: v1(25,20.3) 25.2,20.5 27.5,20.5 28.2,21.2 28.2,22.5 28.94,23.24 C23.2 31.36,23.24 31.9,22.7 U6.37
  TOP w2: J4.3 10.25,17.95 11.2,17 15.9,17
  BOTTOM w0.254: v1(19.5,13.8) 19.5,15.3 20.2,16 25.7,16 26.3,16.6 26.3,19 v1(25,20.3)
V_MOTOR_B1: length 23.5
  TOP w0.254: U6.48 31.9,15.7 31.36,15.16 C28.2 28.94,15.16 28.2,15.9 28.2,17.1 27.7,17.6 24.7,17.6 24.3,18 24.3,18.6 23.82,19.09 21.11,19.09 21.07,19.04 Q6.1
  TOP w2: 15.6,22.4 11.4,22.4 9.45,20.45 J4.2
V_MOTOR_B2: length 31
  TOP w0.254: v1(25,18.4) 27.5,18.4 29.04,16.86 C27.2 29.5,17.3 30.1,17.3 30.75,17.95 U6.45
  TOP w2: J4.1 12.45,27.8 15.6,27.8
  BOTTOM w0.254: v1(25,18.4) 25,17.75 24.75,17.5 20.2,17.5 19.5,18.2 v1(19.5,24.6)
V_SRAH: length 13.5
  TOP w0.203: R60.1 v1(30.7,11) ; v1(38.4,11) 37.6,11 37.3,11.3 37.3,12.8 36.95,13.15 U6.8
  BOTTOM w0.203: v1(38.4,11) v1(30.7,11)
V_SRAL: length 15.2
  TOP w0.203: v1(38.4,9.76) 37.14,9.76 36.8,10.1 36.8,12.7 36.45,13.05 U6.7 ; R62.1 v1(30.7,9.8)
  BOTTOM w0.203: v1(38.4,9.76) 30.74,9.76 v1(30.7,9.8)
V_SRBH: length 26.7
  TOP w0.203: R37.1 v1(30.7,27) ; v1(38.4,11.8) 38,11.8 37.7,12.1 37.7,13 37.45,13.25 U6.9
  BOTTOM w0.203: v1(38.4,11.8) 33.7,11.8 33,12.5 33,26.3 32.3,27 v1(30.7,27)
V_SRBL: length 25.6
  TOP w0.203: U6.10 37.95,13.45 38.4,13 v1(38.4,12.54) ; R35.1 v1(30.7,28.2)
  BOTTOM w0.203: v1(30.7,28.2) 31.7,28.2 33.4,26.5 33.4,12.8 33.66,12.54 v1(38.4,12.54)
N17303878: length 1.5
  TOP w0.254: D3.1 97.39,51.05 R2.2
N17307565: length 3
  TOP w0.254: U3.31 35.95,46.45 36.31,46.81 36.31,48.16 C6.1
N17307569: length 4.1
  TOP w0.254: U3.32 35.45,46.65 35.8,47 35.8,48.6 36.45,49.25 C6.2
N17307573: length 3.1
  TOP w0.254: U3.34 34.45,46.65 33.5,47.6 C4.1
N17307656: length 3.1
  TOP w0.254: C12.1 29.63,41.05 U3.43
N17307666: length 5.9
  TOP w0.254: U3.29 v1(36.95,47.15)
  TOP w0.508: v1(36.95,47.15) 37.7,47.9 C7.1 38.05,48.35 38.5,48.8 L1.1
N17307699: length 5.9
  TOP w0.254: C13.1 29.08,35.7 33.4,35.7 33.95,36.25 U3.2
N17307815: length 6
  TOP w0.254: C8.1 29.08,46.9 33.5,46.9 33.95,46.45 U3.35
N17307862: length 3.1
  TOP w0.254: C10.1 29.63,41.55 U3.42
N17307871: length 1.7
  TOP w0.203: R8.1 D1.2
N17307873: length 1.7
  TOP w0.203: R9.1 D2.2
N17307943: length 2.7
  TOP w0.254: R15.2 42.4,43.05 U3.22
N17308782: length 1.8
  TOP w0.254: Q2.2 22.62,42.57 R16.2
N17308789: length 1.8
  TOP w0.254: R10.2 22.62,47.97 Q1.2
N17308801: length 1.4
  TOP w0.254: R6.2 27.7,49.1 27.6,49
N17308828: length 1.8
  TOP w0.254: R13.2 22.61,45.11 Q2.4
N17308838: length 1.8
  TOP w0.254: Q1.4 22.64,50.51 R3.2
N17308973: length 1.8
  TOP w0.254: Q4.2 22.62,31.77 R32.2
N17308980: length 1.8
  TOP w0.254: R23.2 22.62,37.17 Q3.2
N17308992: length 1.3
  TOP w0.254: R29.2 27.6,33.1
N17309019: length 1.8
  TOP w0.254: R27.2 22.64,34.31 Q4.4
N17309029: length 1.8
  TOP w0.254: Q3.4 22.64,39.71 R20.2
N17311488: length 3
  TOP w0.254: U6.31 35.95,24.35 36.31,24.71 36.31,26.07 C21.1
N17311492: length 4.1
  TOP w0.254: C21.2 36.45,27.15 35.8,26.5 35.8,24.9 35.45,24.55 U6.32
N17311496: length 3.1
  TOP w0.254: C19.1 33.5,25.5 34.45,24.55 U6.34
N17311579: length 3.1
  TOP w0.254: U6.43 29.63,18.95 C27.1
N17311589: length 5.9
  TOP w0.254: U6.29 v1(36.95,25.05)
  TOP w0.508: L3.1 38.5,26.7 38.05,26.25 C22.1 37.7,25.8 v1(36.95,25.05)
N17311622: length 5.9
  TOP w0.254: U6.2 33.95,14.15 33.4,13.6 29.08,13.6 C28.1
N17311738: length 6
  TOP w0.254: U6.35 33.95,24.35 33.5,24.8 29.08,24.8 C23.1
N17311785: length 3.1
  TOP w0.254: U6.42 29.63,19.45 C25.1
N17311794: length 1.7
  TOP w0.203: R39.1 D5.2
N17311796: length 1.7
  TOP w0.203: R40.1 D6.2
N17311866: length 2.7
  TOP w0.254: R46.2 42.4,20.95 U6.22
N17312677: length 1.8
  TOP w0.254: Q6.2 22.62,20.47 R47.2
N17312684: length 1.8
  TOP w0.254: Q5.2 22.62,25.87 R41.2
N17312696: length 1.4
  TOP w0.254: 27.6,26.9 27.7,27 R37.2
N17312723: length 1.8
  TOP w0.254: Q6.4 22.61,23.01 R44.2
N17312733: length 1.8
  TOP w0.254: Q5.4 22.64,28.41 R34.2
N17312868: length 1.8
  TOP w0.254: R63.2 22.62,9.67 Q8.2
N17312875: length 1.8
  TOP w0.254: Q7.2 22.62,15.07 R54.2
N17312887: length 1.3
  TOP w0.254: R60.2 27.6,11
N17312914: length 1.8
  TOP w0.254: Q8.4 22.64,12.21 R58.2
N17312924: length 1.8
  TOP w0.254: R51.2 22.64,17.61 Q7.4
N17316894: length 2.2
  TOP w0.203: U2.2 51.75,45.8 R12.2
N17317207: length 2.2
  TOP w0.203: U5.2 51.75,23.8 R43.2
N17322095: length 2.8
  TOP w0.203: U1.4 45.8,51.05 R1.1 R5.2
N17322682: length 2.9
  TOP w0.203: R36.2 R33.1 45.9,29.15 U4.4

## Copper pours and planes (outline as drawn; the poured copper is in the pictures)
GND on TOP: 0.3,57.4 1.27,59.73 3.6,60.7 96.4,60.7 98.73,59.73 99.7,57.4 99.7,31.1 99.49,30.61 99,30.4 78.6,30.4 78.18,30.22 78,29.8 78,13.5 78.18,13.08 78.6,12.9 99,12.9 99.49,12.69 99.7,12.2 99.7,3.6 98.73,1.27 96.4,0.3 3.6,0.3 1.27,1.27 0.3,3.6 ; 46 cut-outs
GND on BOTTOM: 0.3,57.4 1.27,59.73 3.6,60.7 96.4,60.7 98.73,59.73 99.7,57.4 99.7,31.1 99.49,30.61 99,30.4 78.6,30.4 78.18,30.22 78,29.8 78,13.5 78.18,13.08 78.6,12.9 99,12.9 99.49,12.69 99.7,12.2 99.7,3.6 98.73,1.27 96.4,0.3 3.6,0.3 1.27,1.27 0.3,3.6 ; 31 cut-outs
VCC_24V on TOP: 14.7,42.9 14.7,40.7 17.8,40.7 18.1,41 18.1,42.6 17.8,42.9
VCC_24V on TOP: 14.7,15.4 14.7,13.2 17.8,13.2 18.1,13.5 18.1,15.1 17.8,15.4
VCC_24V on TOP: 14.7,20.8 14.7,18.6 17.8,18.6 18.1,18.9 18.1,20.5 17.8,20.8
VCC_24V on TOP: 14.7,32.1 14.7,29.9 17.8,29.9 18.1,30.2 18.1,31.8 17.8,32.1
VCC_24V on TOP: 14.7,48.2 14.7,46 17.8,46 18.1,46.3 18.1,47.9 17.8,48.2
VCC_24V on TOP: 14.7,37.5 14.7,35.3 17.8,35.3 18.1,35.6 18.1,37.2 17.8,37.5
VCC_24V on TOP: 14.7,10 14.7,7.8 17.8,7.8 18.1,8.1 18.1,9.7 17.8,10
VCC_24V on TOP: 14.7,26.1 14.7,23.9 17.8,23.9 18.1,24.2 18.1,25.8 17.8,26.1
VCC_24V on BOTTOM: 14.9,28.9 17.9,28.9 18.1,28.7 18.1,8.1 17.8,7.8 14.3,7.8 14,7.5 14,5.5 13.7,5.2 10.8,5.2 10.5,5.5 10.5,11.3 10.9,11.7 14.4,11.7 14.7,12 14.7,28.7
VCC_24V on BOTTOM: 10.8,55.4 13.8,55.4 14.1,55.1 14.1,53.9 14.7,53.3 17.2,53.3 18.1,52.4 18.1,30.2 17.8,29.9 15,29.9 14.7,30.2 14.7,47.6 14.2,48.1 10.8,48.1 10.5,48.4 10.5,55.1
H_MOTOR_A1 on TOP: 21.7,31.1 21.7,29.9 18.8,29.9 18.5,30.2 18.5,32.3 18.1,32.7 14.7,32.7 14.7,34.7 19.4,34.7 19.7,34.4 19.7,31.4 20,31.1
H_MOTOR_A2 on TOP: 21.7,36.5 21.7,35.3 18.8,35.3 18.5,35.6 18.5,37.7 18.1,38.1 14.7,38.1 14.7,40.1 19.4,40.1 19.7,39.8 19.7,36.8 20,36.5
H_MOTOR_B1 on TOP: 21.7,41.9 21.7,40.7 18.8,40.7 18.5,41 18.5,43.1 18.1,43.5 14.7,43.5 14.7,45.5 19.4,45.5 19.7,45.2 19.7,42.2 20,41.9
H_MOTOR_B2 on TOP: 21.7,47.2 21.7,46 18.8,46 18.5,46.3 18.5,48.4 18.1,48.8 14.7,48.8 14.7,50.8 19.4,50.8 19.7,50.5 19.7,47.5 20,47.2
V_MOTOR_A1 on TOP: 21.7,9 21.7,7.8 18.8,7.8 18.5,8.1 18.5,10.2 18.1,10.6 14.7,10.6 14.7,12.6 19.4,12.6 19.7,12.3 19.7,9.3 20,9
V_MOTOR_A2 on TOP: 21.7,14.4 21.7,13.2 18.8,13.2 18.5,13.5 18.5,15.6 18.1,16 14.7,16 14.7,18 19.4,18 19.7,17.7 19.7,14.7 20,14.4
V_MOTOR_B1 on TOP: 21.7,19.8 21.7,18.6 18.8,18.6 18.5,18.9 18.5,21 18.1,21.4 14.7,21.4 14.7,23.4 19.4,23.4 19.7,23.1 19.7,20.1 20,19.8
V_MOTOR_B2 on TOP: 21.7,25.1 21.7,23.9 18.8,23.9 18.5,24.2 18.5,26.3 18.1,26.7 14.7,26.7 14.7,28.7 19.4,28.7 19.7,28.4 19.7,25.4 20,25.1
N17308801 on TOP: 27.9,49.3 27.9,43.7 27.85,43.65 27.9,43.6 27.9,43.5 27.6,43.2 20.2,43.2 20.2,44.5 24.3,44.5 24.5,44.7 24.5,48.4 24.3,48.6 20.2,48.6 20.2,49.9 24.1,49.9 24.5,49.5 27.7,49.5
N17308992 on TOP: 27.8,38.8 27.8,32.9 27.7,32.8 24.6,32.8 24.2,32.4 20.1,32.4 20.1,33.7 24.2,33.7 24.4,33.9 24.4,37.6 24.2,37.8 20.1,37.8 20.1,39.1 27.5,39.1
N17312696 on TOP: 27.9,27.2 27.9,21.6 27.85,21.55 27.9,21.5 27.9,21.4 27.6,21.1 20.2,21.1 20.2,22.4 24.3,22.4 24.5,22.6 24.5,26.3 24.3,26.5 20.2,26.5 20.2,27.8 24.1,27.8 24.5,27.4 27.7,27.4
N17312887 on TOP: 27.8,16.7 27.8,10.8 27.7,10.7 24.6,10.7 24.2,10.3 20.1,10.3 20.1,11.6 24.2,11.6 24.4,11.8 24.4,15.5 24.2,15.7 20.1,15.7 20.1,17 27.5,17

## Text on the board
Ref Des/Silkscreen Bottom: XXXLZJXXX | TMC2160A_V10_220915
Ref Des/Silkscreen Top: HORI | VERT | B2 | B1 | A2 | A1 | 3V3 | DRVEN | DIAG0 | DIAG1 | DIR | STEP | SDAO | SDAI | SCLK | SCS | GND | 24V
DISPLAY_TOP: FIGURE | FINISHED_SIZE | 0.3048 | 0.4572 | 0.8 | 0.9 | 1.1 | 1.5 | 3.3 | 3.0x1.0 | DRILL CHART: TOP to BOTTOM | ALL UNITS ARE IN MILLIMETERS | ROTATION | - | 0.000 | 90.000 | PLATED | QTY | 269 | 12 | 4 | 8 | 60 | 2 | 1 | 362 | TOTAL HOLES:
